# Altium PCB FullSheetOLD.PcbDoc (part 4 of 8)
Units mm, origin at the board's own origin, x right, y up, seen from the top; angles counter-clockwise.
Board outline 132.46 x 194.44 mm, 4 copper layers (Top Copper, L2_GND, L3_PWR_SIG, Bottom Copper), stack 1.586 mm thick; 495 components, 210 nets, 2171 pads, 1027 vias.
Unrouted connection lines stored in the file: 53.
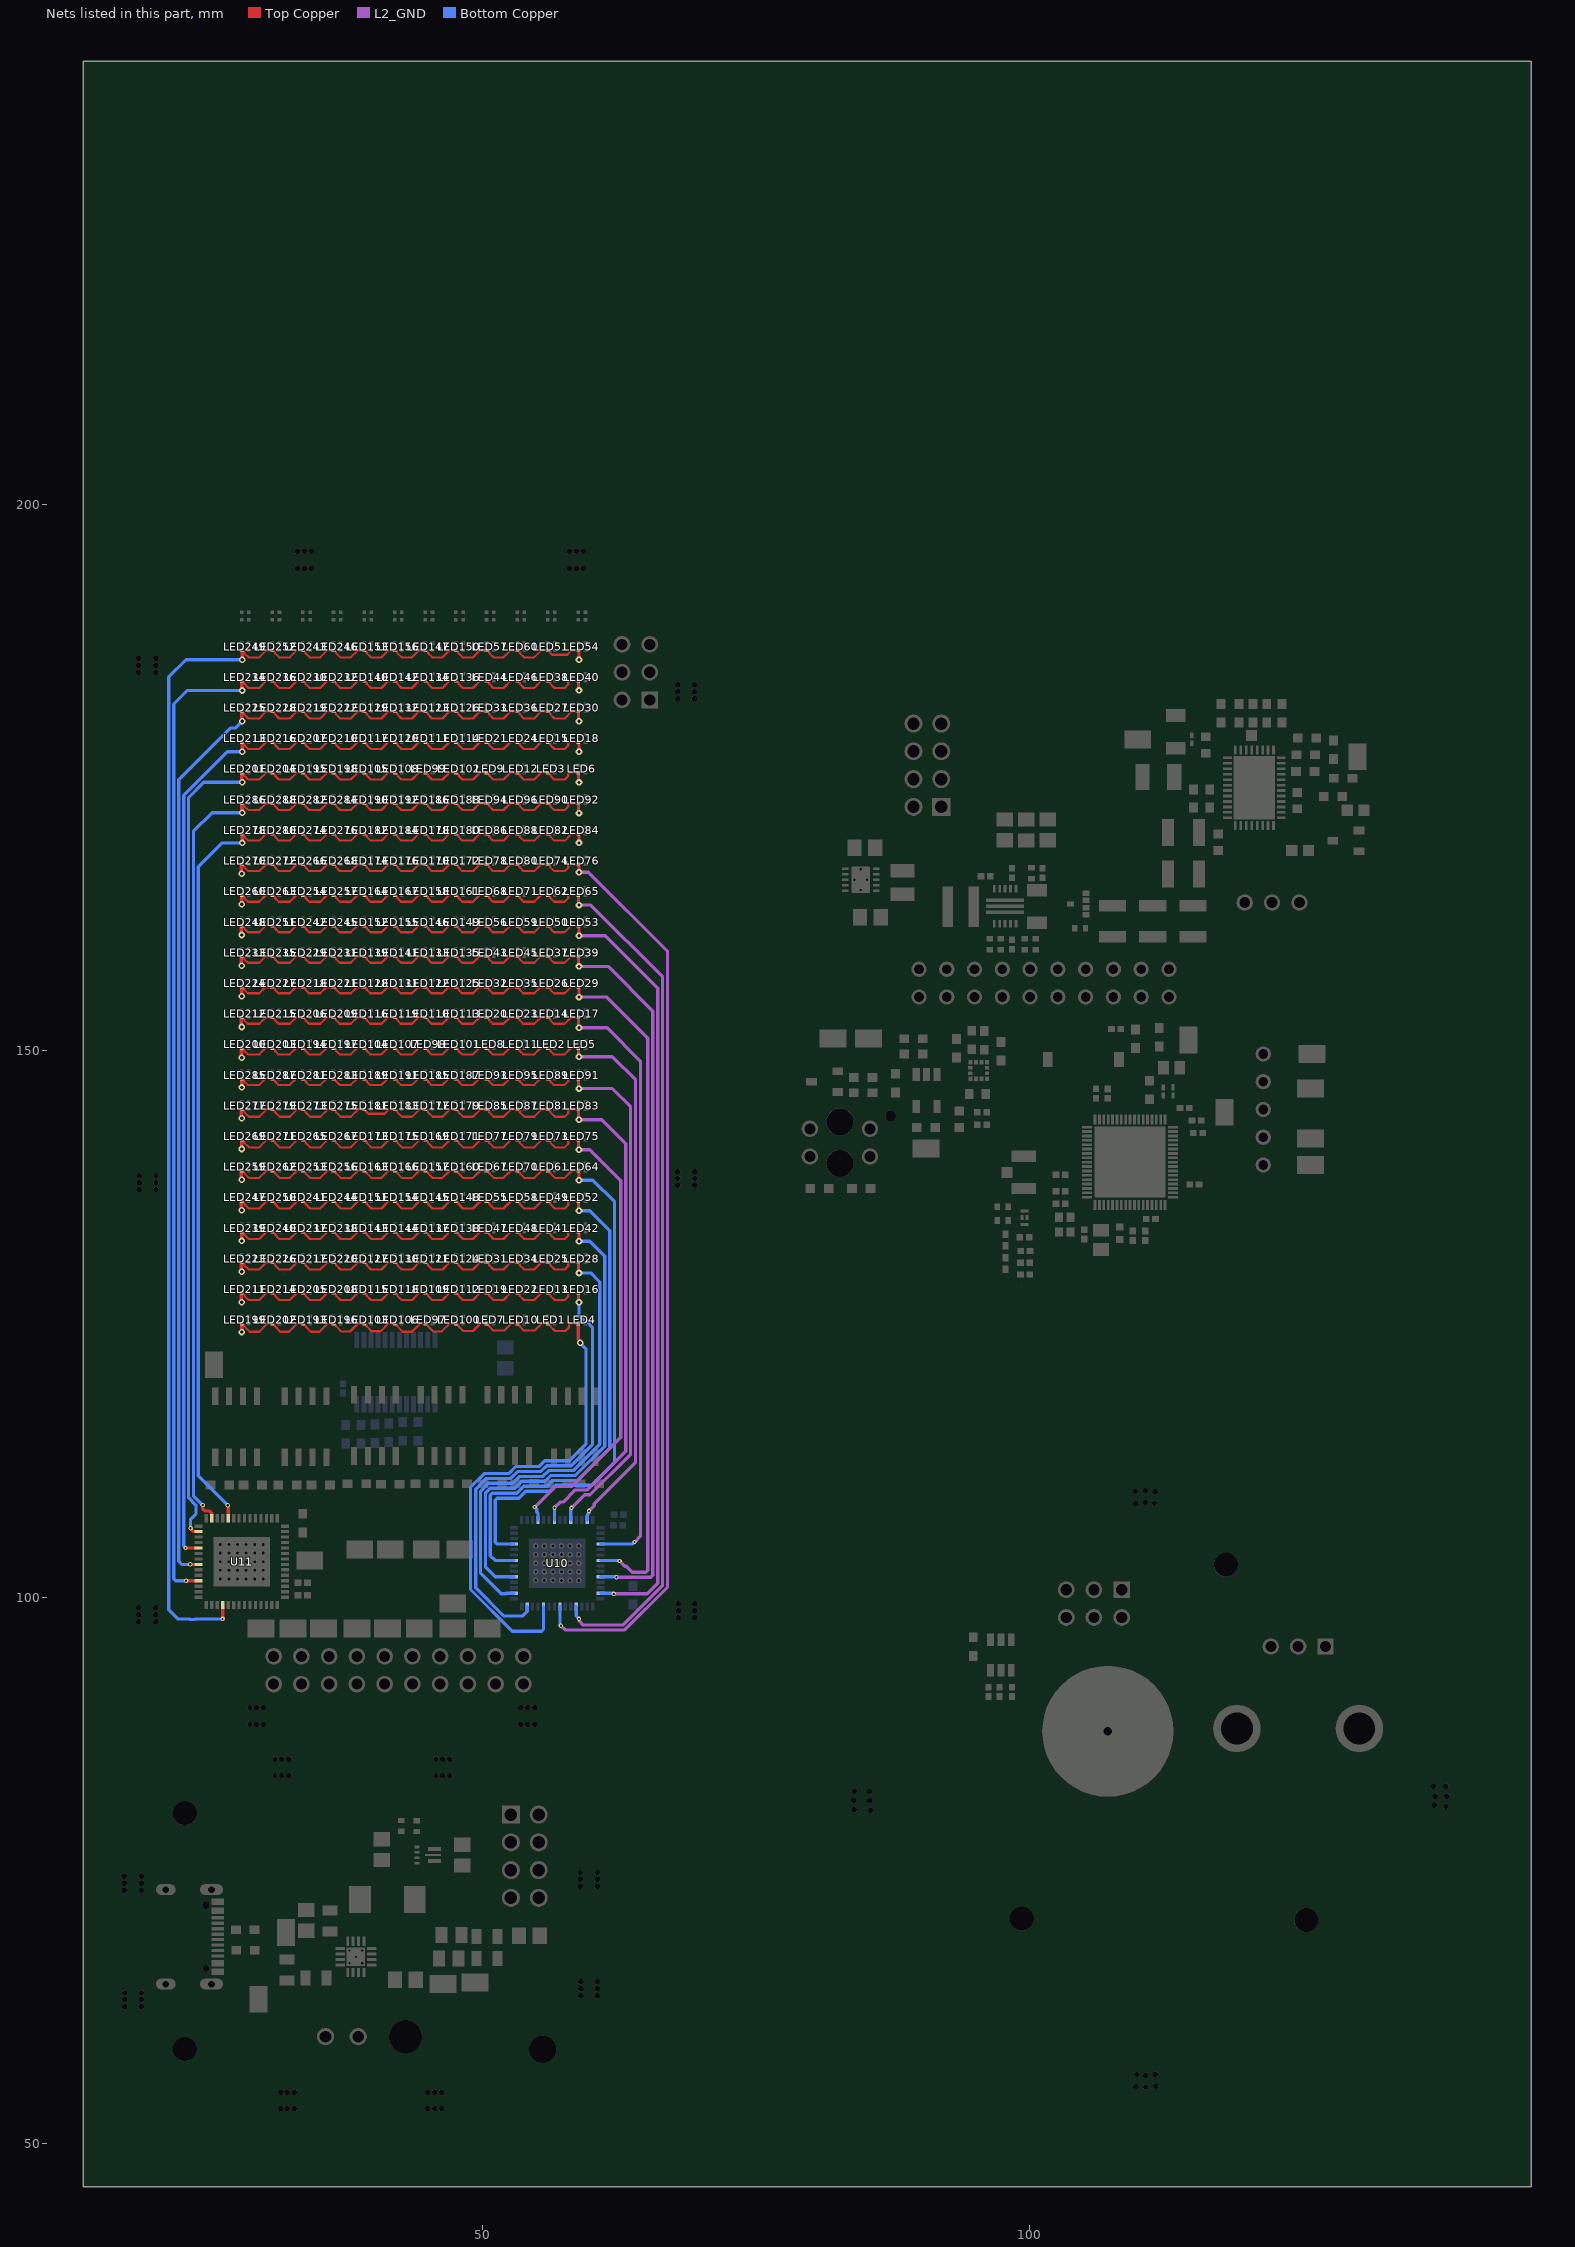
[diagram p5: the nets of this part, all layers, seen from the top]

## Via types
v1: diameter 0.6, hole 0.3, Top Copper to Bottom Copper, 857 vias
v2: diameter 0.8, hole 0.4, Top Copper to Bottom Copper, 91 vias
v3: diameter 0.4, hole 0.2, Top Copper to Bottom Copper, 79 vias

## Nets (pads, with @x,y where several pads share a name; then routed paths per layer and width w, separated by ;. In a path a pad name is that pad's centre, name@x,y a point inside that pad or via, vN(x,y) a via of type N, cw(c..) or ccw(c..) an arc to the next point about the centre after c; other vN are vias at no path point) (continued)
B0: LED1.1 LED4.1 LED7.1 LED10.1 LED97.1 LED100.1 LED103.1 LED106.1 LED193.1 LED196.1 LED199.1 LED202.1 U10.10 | length 82.1
  Top Copper w0.2: LED199.1@27.94,125.07 28.005,125.005 28.068,125.005 28.185,124.888 28.185,124.801 28.672,124.314 29.547,124.314 29.947,124.714 29.947,124.742 30.275,125.07 LED202.1@30.74,125.07 30.805,125.005 30.868,125.005 30.985,124.888 30.985,124.801 31.472,124.314 32.272,124.314 33.028,125.07 LED193.1@33.54,125.07 33.605,125.005 33.668,125.005 33.785,124.888 33.785,124.801 34.272,124.314 35.066,124.314 35.822,125.07 LED196.1@36.34,125.07 36.405,125.005 36.468,125.005 36.585,124.888 36.585,124.801 37.046,124.34 37.852,124.34 38.582,125.07 LED103.1@39.14,125.07 39.205,125.005 39.268,125.005 39.385,124.888 39.385,124.801 39.826,124.36 40.654,124.36 41.363,125.07 LED106.1@41.94,125.07 42.005,125.005 42.068,125.005 42.185,124.888 42.185,124.801 42.672,124.314 43.517,124.314 44.273,125.07 LED97.1@44.74,125.07 44.805,125.005 44.868,125.005 44.985,124.888 44.985,124.801 45.438,124.349 46.249,124.349 46.971,125.07 LED100.1@47.54,125.07 47.605,125.005 47.668,125.005 47.785,124.888 47.785,124.801 48.2,124.386 49.108,124.386 49.792,125.07 LED7.1@50.34,125.07 50.405,125.005 50.468,125.005 50.585,124.888 50.585,124.801 50.953,124.434 51.969,124.434 52.605,125.07 LED10.1@53.14,125.07 53.205,125.005 53.268,125.005 53.385,124.888 53.385,124.801 53.753,124.434 54.765,124.434 55.401,125.07 LED1.1@55.94,125.07 56.005,125.005 56.068,125.005 56.185,124.888 56.185,124.801 56.6,124.386 57.559,124.386 57.881,124.708 57.881,124.953 57.998,125.07 LED4.1@58.74,125.07
  Top Copper w0.3: v1(27.941,124.28) LED199.1@27.941,125.052 ; LED4.1@58.74,125.07 58.74,124.228 58.729,124.217 58.729,123.597 58.928,123.398 v1(58.928,123.317)
  Bottom Copper w0.3: U10.10@55.557,99.176 55.557,98.861 55.557,97.077 55.381,96.901 52.704,96.901 48.877,100.728 48.877,110.085 50.131,111.339 52.359,111.339 52.994,111.974 55.135,111.974 55.669,112.508 57.921,112.508 59.436,114.023 59.436,122.764 58.928,123.272 v1(58.928,123.317)
B1: LED13.1 LED16.1 LED19.1 LED22.1 LED109.1 LED112.1 LED115.1 LED118.1 LED205.1 LED208.1 LED211.1 LED214.1 U10.13 | length 80.6
  Top Copper w0.2: LED211.1@27.94,127.87 28.005,127.805 28.068,127.805 28.185,127.688 28.185,127.601 28.574,127.212 29.55,127.212 30.208,127.87 LED214.1@30.74,127.87 30.805,127.805 30.868,127.805 30.985,127.688 30.985,127.601 31.374,127.212 32.344,127.212 33.002,127.87 LED205.1@33.54,127.87 33.605,127.805 33.668,127.805 33.785,127.688 33.785,127.601 34.174,127.212 35.138,127.212 35.796,127.87 LED208.1@36.34,127.87 36.405,127.805 36.468,127.805 36.585,127.688 36.585,127.601 36.974,127.212 37.932,127.212 38.59,127.87 LED115.1@39.14,127.87 39.205,127.805 39.268,127.805 39.385,127.688 39.385,127.601 39.774,127.212 40.726,127.212 41.384,127.87 LED118.1@41.94,127.87 42.005,127.805 42.068,127.805 42.185,127.688 42.185,127.601 42.574,127.212 43.535,127.212 44.193,127.87 LED109.1@44.74,127.87 44.805,127.805 44.868,127.805 44.985,127.688 44.985,127.601 45.374,127.212 46.314,127.212 46.972,127.87 LED112.1@47.54,127.87 47.605,127.805 47.668,127.805 47.785,127.688 47.785,127.601 48.174,127.212 49.108,127.212 49.766,127.87 LED19.1@50.34,127.87 50.405,127.805 50.468,127.805 50.585,127.688 50.585,127.601 50.974,127.212 51.902,127.212 52.56,127.87 LED22.1@53.14,127.87 53.205,127.805 53.268,127.805 53.385,127.688 53.385,127.601 53.774,127.212 54.711,127.212 55.369,127.87 LED13.1@55.94,127.87 56.005,127.805 56.068,127.805 56.185,127.688 56.185,127.601 56.574,127.212 57.49,127.212 57.812,127.534 57.812,127.753 57.929,127.87 LED16.1@58.74,127.87
  Top Copper w0.3: v1@27.895,127.054 LED211.1@27.895,127.898 ; LED16.1@58.74,127.87 58.755,127.855 58.755,127.046 v1(58.801,127)
  Bottom Copper w0.3: U10.13@54.057,99.176 54.057,98.725 53.631,98.298 51.943,98.298 49.345,100.896 49.345,109.917 50.317,110.889 52.545,110.889 53.18,111.524 55.321,111.524 55.855,112.058 58.108,112.058 60.036,113.986 60.036,124.709 59.492,125.253 59.345,125.253 58.801,125.797 v1(58.801,127)
  other v1: 27.941,127.008
B2: LED25.1 LED28.1 LED31.1 LED34.1 LED121.1 LED124.1 LED127.1 LED130.1 LED217.1 LED220.1 LED223.1 LED226.1 U10.16 | length 80.5
  Top Copper w0.2: LED223.1@27.94,130.67 28.005,130.605 28.068,130.605 28.185,130.488 28.185,130.401 28.58,130.006 29.55,130.006 30.214,130.67 LED226.1@30.74,130.67 30.805,130.605 30.868,130.605 30.985,130.488 30.985,130.401 31.38,130.006 32.344,130.006 33.008,130.67 LED217.1@33.54,130.67 33.605,130.605 33.668,130.605 33.785,130.488 33.785,130.401 34.18,130.006 35.138,130.006 35.802,130.67 LED220.1@36.34,130.67 36.405,130.605 36.468,130.605 36.585,130.488 36.585,130.401 36.98,130.006 37.932,130.006 38.596,130.67 LED127.1@39.14,130.67 39.205,130.605 39.268,130.605 39.385,130.488 39.385,130.401 39.78,130.006 40.726,130.006 41.39,130.67 LED130.1@41.94,130.67 42.005,130.605 42.068,130.605 42.185,130.488 42.185,130.401 42.58,130.006 43.535,130.006 44.199,130.67 LED121.1@44.74,130.67 44.805,130.605 44.868,130.605 44.985,130.488 44.985,130.401 45.38,130.006 46.314,130.006 46.978,130.67 LED124.1@47.54,130.67 47.605,130.605 47.668,130.605 47.785,130.488 47.785,130.401 48.18,130.006 49.108,130.006 49.772,130.67 LED31.1@50.34,130.67 50.405,130.605 50.468,130.605 50.585,130.488 50.585,130.401 50.98,130.006 51.902,130.006 52.566,130.67 LED34.1@53.14,130.67 53.205,130.605 53.268,130.605 53.385,130.488 53.385,130.401 53.78,130.006 54.711,130.006 55.375,130.67 LED25.1@55.94,130.67 56.005,130.605 56.068,130.605 56.185,130.488 56.185,130.401 56.58,130.006 57.49,130.006 57.812,130.328 57.812,130.553 57.929,130.67 LED28.1@58.74,130.67
  Top Copper w0.3: v1@27.895,129.859 LED223.1@27.895,130.698 ; LED28.1@58.74,130.67 58.755,130.655 58.755,129.735 v1(58.801,129.689)
  Bottom Copper w0.3: U10.16@52.846,100.386 52.153,100.386 52.104,100.336 51.683,100.336 49.795,102.224 49.795,109.73 50.504,110.439 52.732,110.439 53.367,111.074 55.508,111.074 56.042,111.608 58.294,111.608 60.706,114.02 60.706,128.865 59.881,129.689 v1(58.801,129.689)
  other v1: 27.941,129.813
B3: LED41.1 LED42.1 LED47.1 LED48.1 LED137.1 LED138.1 LED143.1 LED144.1 LED237.1 LED238.1 LED239.1 LED240.1 U10.19 | length 82
  Top Copper w0.2: LED239.1@27.94,133.47 28.005,133.405 28.068,133.405 28.185,133.288 28.185,133.201 28.586,132.8 29.55,132.8 30.22,133.47 LED240.1@30.74,133.47 30.805,133.405 30.868,133.405 30.985,133.288 30.985,133.201 31.386,132.8 32.344,132.8 33.014,133.47 LED237.1@33.54,133.47 33.605,133.405 33.668,133.405 33.785,133.288 33.785,133.201 34.186,132.8 35.138,132.8 35.808,133.47 LED238.1@36.34,133.47 36.405,133.405 36.468,133.405 36.585,133.288 36.585,133.201 36.986,132.8 37.932,132.8 38.602,133.47 LED143.1@39.14,133.47 39.205,133.405 39.268,133.405 39.385,133.288 39.385,133.201 39.786,132.8 40.726,132.8 41.396,133.47 LED144.1@41.94,133.47 42.005,133.405 42.068,133.405 42.185,133.288 42.185,133.201 42.586,132.8 43.535,132.8 44.205,133.47 LED137.1@44.74,133.47 44.805,133.405 44.868,133.405 44.985,133.288 44.985,133.201 45.386,132.8 46.314,132.8 46.984,133.47 LED138.1@47.54,133.47 47.605,133.405 47.668,133.405 47.785,133.288 47.785,133.201 48.186,132.8 49.108,132.8 49.778,133.47 LED47.1@50.34,133.47 50.405,133.405 50.468,133.405 50.585,133.288 50.585,133.201 50.986,132.8 51.902,132.8 52.572,133.47 LED48.1@53.14,133.47 53.205,133.405 53.268,133.405 53.385,133.288 53.385,133.201 53.786,132.8 54.711,132.8 55.381,133.47 LED41.1@55.94,133.47 56.005,133.405 56.068,133.405 56.185,133.288 56.185,133.201 56.586,132.8 57.49,132.8 57.812,133.122 57.812,133.353 57.929,133.47 LED42.1@58.74,133.47
  Top Copper w0.3: v1(27.941,132.618) LED239.1@27.941,133.368 ; LED42.1@58.74,133.47 58.755,133.455 58.755,133.384 58.801,133.338 v1(58.801,132.588)
  Bottom Copper w0.3: U10.19@52.846,101.886 51.149,101.886 50.245,102.79 50.245,109.544 50.69,109.989 52.918,109.989 53.553,110.624 55.694,110.624 56.228,111.158 58.48,111.158 61.156,113.834 61.156,131.209 59.777,132.588 v1(58.801,132.588)
B4: LED49.1 LED52.1 LED55.1 LED58.1 LED145.1 LED148.1 LED151.1 LED154.1 LED241.1 LED244.1 LED247.1 LED250.1 U10.22 | length 83.4
  Top Copper w0.2: LED247.1@27.94,136.27 28.005,136.205 28.068,136.205 28.185,136.088 28.185,136.001 28.592,135.594 29.55,135.594 30.226,136.27 LED250.1@30.74,136.27 30.805,136.205 30.868,136.205 30.985,136.088 30.985,136.001 31.392,135.594 32.344,135.594 33.02,136.27 LED241.1@33.54,136.27 33.605,136.205 33.668,136.205 33.785,136.088 33.785,136.001 34.192,135.594 35.138,135.594 35.814,136.27 LED244.1@36.34,136.27 36.405,136.205 36.468,136.205 36.585,136.088 36.585,136.001 36.992,135.594 37.932,135.594 38.608,136.27 LED151.1@39.14,136.27 39.205,136.205 39.268,136.205 39.385,136.088 39.385,136.001 39.792,135.594 40.726,135.594 41.402,136.27 LED154.1@41.94,136.27 42.005,136.205 42.068,136.205 42.185,136.088 42.185,136.001 42.592,135.594 43.535,135.594 44.211,136.27 LED145.1@44.74,136.27 44.805,136.205 44.868,136.205 44.985,136.088 44.985,136.001 45.392,135.594 46.314,135.594 46.99,136.27 LED148.1@47.54,136.27 47.605,136.205 47.668,136.205 47.785,136.088 47.785,136.001 48.192,135.594 49.108,135.594 49.784,136.27 LED55.1@50.34,136.27 50.405,136.205 50.468,136.205 50.585,136.088 50.585,136.001 50.992,135.594 51.902,135.594 52.578,136.27 LED58.1@53.14,136.27 53.205,136.205 53.268,136.205 53.385,136.088 53.385,136.001 53.792,135.594 54.711,135.594 55.387,136.27 LED49.1@55.94,136.27 56.005,136.205 56.068,136.205 56.185,136.088 56.185,136.001 56.592,135.594 57.49,135.594 57.812,135.916 57.812,136.153 57.929,136.27 LED52.1@58.74,136.27
  Top Copper w0.3: v1@27.895,135.469 LED247.1@27.895,136.298 ; LED52.1@58.74,136.27 58.755,136.255 58.755,135.428 v1(58.801,135.382)
  Bottom Copper w0.3: U10.22@52.846,103.387 51.134,103.387 50.695,103.826 50.695,109.358 50.877,109.539 53.105,109.539 53.739,110.174 55.881,110.174 56.415,110.708 58.667,110.708 61.606,113.647 61.606,133.553 59.777,135.382 v1(58.801,135.382)
  other v1: 27.941,135.423
B5: LED61.1 LED64.1 LED67.1 LED70.1 LED157.1 LED160.1 LED163.1 LED166.1 LED253.1 LED256.1 LED259.1 LED262.1 U10.25 | length 85.2
  Top Copper w0.2: LED259.1@27.94,139.07 28.005,139.005 28.068,139.005 28.185,138.888 28.185,138.801 28.598,138.388 29.55,138.388 30.232,139.07 LED262.1@30.74,139.07 30.805,139.005 30.868,139.005 30.985,138.888 30.985,138.801 31.398,138.388 32.344,138.388 33.026,139.07 LED253.1@33.54,139.07 33.605,139.005 33.668,139.005 33.785,138.888 33.785,138.801 34.198,138.388 35.138,138.388 35.82,139.07 LED256.1@36.34,139.07 36.405,139.005 36.468,139.005 36.585,138.888 36.585,138.801 36.998,138.388 37.932,138.388 38.614,139.07 LED163.1@39.14,139.07 39.205,139.005 39.268,139.005 39.385,138.888 39.385,138.801 39.798,138.388 40.726,138.388 41.408,139.07 LED166.1@41.94,139.07 42.005,139.005 42.068,139.005 42.185,138.888 42.185,138.801 42.598,138.388 43.535,138.388 44.217,139.07 LED157.1@44.74,139.07 44.805,139.005 44.868,139.005 44.985,138.888 44.985,138.801 45.398,138.388 46.314,138.388 46.996,139.07 LED160.1@47.54,139.07 47.605,139.005 47.668,139.005 47.785,138.888 47.785,138.801 48.198,138.388 49.108,138.388 49.79,139.07 LED67.1@50.34,139.07 50.405,139.005 50.468,139.005 50.585,138.888 50.585,138.801 50.998,138.388 51.902,138.388 52.584,139.07 LED70.1@53.14,139.07 53.205,139.005 53.268,139.005 53.385,138.888 53.385,138.801 53.798,138.388 54.711,138.388 55.393,139.07 LED61.1@55.94,139.07 56.005,139.005 56.068,139.005 56.185,138.888 56.185,138.801 56.598,138.388 57.49,138.388 58.172,139.07 LED64.1@58.74,139.07
  Top Copper w0.3: v1@27.895,138.274 LED259.1@27.895,139.098 ; LED64.1@58.74,139.07 58.755,139.055 58.801,139.009 v1(58.801,138.176)
  Bottom Copper w0.3: U10.25@52.846,104.887 51.323,104.887 51.145,105.065 51.145,108.913 51.321,109.089 53.291,109.089 53.926,109.724 56.126,109.724 56.66,110.258 59.96,110.258 62.056,112.354 62.056,136.191 60.071,138.176 v1(58.801,138.176)
  other v1: 27.941,138.228
B6: LED73.1 LED75.1 LED77.1 LED79.1 LED169.1 LED171.1 LED173.1 LED175.1 LED265.1 LED267.1 LED269.1 LED271.1 U10.32 | length 79.7
  Top Copper w0.2: LED269.1@27.94,141.87 28.005,141.805 28.068,141.805 28.185,141.688 28.185,141.601 28.604,141.182 29.55,141.182 30.238,141.87 LED271.1@30.74,141.87 30.805,141.805 30.868,141.805 30.985,141.688 30.985,141.601 31.404,141.182 32.344,141.182 33.032,141.87 LED265.1@33.54,141.87 33.605,141.805 33.668,141.805 33.785,141.688 33.785,141.601 34.204,141.182 35.138,141.182 35.826,141.87 LED267.1@36.34,141.87 36.405,141.805 36.468,141.805 36.585,141.688 36.585,141.601 37.004,141.182 37.932,141.182 38.62,141.87 LED173.1@39.14,141.87 39.205,141.805 39.268,141.805 39.385,141.688 39.385,141.601 39.804,141.182 40.726,141.182 41.414,141.87 LED175.1@41.94,141.87 42.005,141.805 42.068,141.805 42.185,141.688 42.185,141.601 42.604,141.182 43.535,141.182 44.223,141.87 LED169.1@44.74,141.87 44.805,141.805 44.868,141.805 44.985,141.688 44.985,141.601 45.404,141.182 46.314,141.182 47.002,141.87 LED171.1@47.54,141.87 47.605,141.805 47.668,141.805 47.785,141.688 47.785,141.601 48.204,141.182 49.108,141.182 49.796,141.87 LED77.1@50.34,141.87 50.405,141.805 50.468,141.805 50.585,141.688 50.585,141.601 51.004,141.182 51.902,141.182 52.59,141.87 LED79.1@53.14,141.87 53.205,141.805 53.268,141.805 53.385,141.688 53.385,141.601 53.804,141.182 54.711,141.182 55.399,141.87 LED73.1@55.94,141.87 56.005,141.805 56.068,141.805 56.185,141.688 56.185,141.601 56.604,141.182 57.49,141.182 57.812,141.504 57.812,141.753 57.929,141.87 LED75.1@58.74,141.87
  Top Copper w0.3: v1(27.941,141.033) LED269.1@27.941,141.783 ; LED75.1@58.74,141.87 58.755,141.855 58.755,141.016 v1(58.801,140.97)
  L2_GND w0.3: v3(54.745,108.275) 56.618,110.148 58.106,110.148 62.625,114.666 62.625,138.122 59.777,140.97 v1(58.801,140.97)
  Bottom Copper w0.3: v3(54.745,108.275) 54.745,108.248 54.93,108.063 54.93,107.811 55.057,107.683 U10.32@55.057,107.097
B7: LED81.1 LED83.1 LED85.1 LED87.1 LED177.1 LED179.1 LED181.1 LED183.1 LED273.1 LED275.1 LED277.1 LED279.1 U10.35 | length 82.5
  Top Copper w0.2: LED277.1@27.94,144.67 28.005,144.605 28.068,144.605 28.185,144.488 28.185,144.401 28.61,143.976 29.55,143.976 30.244,144.67 LED279.1@30.74,144.67 30.805,144.605 30.868,144.605 30.985,144.488 30.985,144.401 31.41,143.976 32.344,143.976 33.038,144.67 LED273.1@33.54,144.67 33.605,144.605 33.668,144.605 33.785,144.488 33.785,144.401 34.21,143.976 35.138,143.976 35.832,144.67 LED275.1@36.34,144.67 36.405,144.605 36.468,144.605 36.585,144.488 36.585,144.401 37.01,143.976 37.932,143.976 38.626,144.67 LED181.1@39.14,144.67 39.385,144.425 39.385,144.401 39.531,144.255 41.005,144.255 41.42,144.67 LED183.1@41.94,144.67 42.005,144.605 42.068,144.605 42.185,144.488 42.185,144.401 42.61,143.976 43.535,143.976 44.229,144.67 LED177.1@44.74,144.67 44.805,144.605 44.868,144.605 44.985,144.488 44.985,144.401 45.41,143.976 46.314,143.976 47.008,144.67 LED179.1@47.54,144.67 47.605,144.605 47.668,144.605 47.785,144.488 47.785,144.401 48.21,143.976 49.108,143.976 49.802,144.67 LED85.1@50.34,144.67 50.405,144.605 50.468,144.605 50.585,144.488 50.585,144.401 51.01,143.976 51.902,143.976 52.596,144.67 LED87.1@53.14,144.67 53.205,144.605 53.268,144.605 53.385,144.488 53.385,144.401 53.81,143.976 54.711,143.976 55.405,144.67 LED81.1@55.94,144.67 56.005,144.605 56.068,144.605 56.185,144.488 56.185,144.401 56.61,143.976 57.49,143.976 57.812,144.298 57.812,144.553 57.929,144.67 LED83.1@58.74,144.67
  Top Copper w0.3: v1@27.895,143.884 LED277.1@27.895,144.698 ; LED83.1@58.74,144.67 58.755,144.655 58.755,143.76 v1(58.801,143.714)
  L2_GND w0.3: v3(56.557,108.204) 57.08,108.727 57.346,108.727 58.46,109.84 59.542,109.84 63.075,113.373 63.075,141.522 60.883,143.714 v1(58.801,143.714)
  Bottom Copper w0.3: U10.35@56.557,107.097 v3(56.557,108.204)
  other v1: 27.941,143.838
B8: LED89.1 LED91.1 LED93.1 LED95.1 LED185.1 LED187.1 LED189.1 LED191.1 LED281.1 LED283.1 LED285.1 LED287.1 U10.38 | length 84.1
  Top Copper w0.2: LED285.1@27.94,147.47 28.005,147.405 28.068,147.405 28.185,147.288 28.185,147.201 28.489,146.897 29.55,146.897 30.123,147.47 LED287.1@30.74,147.47 30.805,147.405 30.868,147.405 30.985,147.288 30.985,147.201 31.289,146.897 32.344,146.897 32.917,147.47 LED281.1@33.54,147.47 33.605,147.405 33.668,147.405 33.785,147.288 33.785,147.201 34.089,146.897 35.138,146.897 35.711,147.47 LED283.1@36.34,147.47 36.405,147.405 36.468,147.405 36.585,147.288 36.585,147.201 36.889,146.897 37.932,146.897 38.505,147.47 LED189.1@39.14,147.47 39.205,147.405 39.268,147.405 39.385,147.288 39.385,147.201 39.689,146.897 40.726,146.897 41.299,147.47 LED191.1@41.94,147.47 42.005,147.405 42.068,147.405 42.185,147.288 42.185,147.201 42.489,146.897 43.535,146.897 44.108,147.47 LED185.1@44.74,147.47 44.805,147.405 44.868,147.405 44.985,147.288 44.985,147.201 45.289,146.897 46.314,146.897 46.887,147.47 LED187.1@47.54,147.47 47.605,147.405 47.668,147.405 47.785,147.288 47.785,147.201 48.089,146.897 49.108,146.897 49.681,147.47 LED93.1@50.34,147.47 50.405,147.405 50.468,147.405 50.585,147.288 50.585,147.201 50.889,146.897 51.902,146.897 52.475,147.47 LED95.1@53.14,147.47 53.205,147.405 53.268,147.405 53.385,147.288 53.385,147.201 53.689,146.897 54.711,146.897 55.284,147.47 LED89.1@55.94,147.47 56.005,147.405 56.068,147.405 56.185,147.288 56.185,147.201 56.489,146.897 57.49,146.897 57.812,147.219 57.812,147.353 57.929,147.47 LED91.1@58.74,147.47
  Top Copper w0.3: v1(27.939,146.662) LED285.1@27.939,147.434 ; LED91.1@58.74,147.47 58.755,147.455 58.755,146.604 v1(58.801,146.558)
  L2_GND w0.3: v3(58.123,108.196) 59.316,109.39 59.809,109.39 63.525,113.106 63.525,144.882 61.975,146.432 61.849,146.558 v1(58.801,146.558)
  Bottom Copper w0.3: U10.38@58.057,107.097 58.057,108.103 58.123,108.169 v3(58.123,108.196)
B9: LED2.1 LED5.1 LED8.1 LED11.1 LED98.1 LED101.1 LED104.1 LED107.1 LED194.1 LED197.1 LED200.1 LED203.1 U10.41 | length 86.4
  Top Copper w0.2: LED200.1@27.94,150.27 28.005,150.205 28.068,150.205 28.185,150.088 28.185,150.001 28.495,149.691 29.55,149.691 30.129,150.27 LED203.1@30.74,150.27 30.805,150.205 30.868,150.205 30.985,150.088 30.985,150.001 31.295,149.691 32.344,149.691 32.923,150.27 LED194.1@33.54,150.27 33.605,150.205 33.668,150.205 33.785,150.088 33.785,150.001 34.095,149.691 35.138,149.691 35.717,150.27 LED197.1@36.34,150.27 36.405,150.205 36.468,150.205 36.585,150.088 36.585,150.001 36.895,149.691 37.932,149.691 38.511,150.27 LED104.1@39.14,150.27 39.205,150.205 39.268,150.205 39.385,150.088 39.385,150.001 39.695,149.691 40.726,149.691 41.305,150.27 LED107.1@41.94,150.27 42.005,150.205 42.068,150.205 42.185,150.088 42.185,150.001 42.495,149.691 43.535,149.691 44.114,150.27 LED98.1@44.74,150.27 44.805,150.205 44.868,150.205 44.985,150.088 44.985,150.001 45.295,149.691 46.314,149.691 46.893,150.27 LED101.1@47.54,150.27 47.605,150.205 47.668,150.205 47.785,150.088 47.785,150.001 48.095,149.691 49.108,149.691 49.687,150.27 LED8.1@50.34,150.27 50.405,150.205 50.468,150.205 50.585,150.088 50.585,150.001 50.895,149.691 51.902,149.691 52.481,150.27 LED11.1@53.14,150.27 53.205,150.205 53.268,150.205 53.385,150.088 53.385,150.001 53.695,149.691 54.711,149.691 55.29,150.27 LED2.1@55.94,150.27 56.005,150.205 56.068,150.205 56.185,150.088 56.185,150.001 56.495,149.691 57.49,149.691 58.069,150.27 LED5.1@58.74,150.27
  Top Copper w0.3: v1@27.893,149.436 LED200.1@27.893,150.28 ; LED5.1@58.74,150.27 58.755,150.255 58.755,149.525 v1(58.801,149.479)
  L2_GND w0.3: v1(58.801,149.479) 61.849,149.479 63.975,147.353 63.975,112.362 60.195,108.582 60.195,108.4 v3(59.72,107.925)
  Bottom Copper w0.3: U10.41@59.557,107.097 59.557,107.549 59.701,107.693 59.701,107.906 v3(59.72,107.925)
  other v1: 27.939,149.39
B10: LED14.1 LED17.1 LED20.1 LED23.1 LED110.1 LED113.1 LED116.1 LED119.1 LED206.1 LED209.1 LED212.1 LED215.1 U10.46 | length 92.8
  Top Copper w0.2: LED212.1@27.94,153.07 28.005,153.005 28.068,153.005 28.185,152.888 28.185,152.801 28.501,152.485 29.55,152.485 30.135,153.07 LED215.1@30.74,153.07 30.805,153.005 30.868,153.005 30.985,152.888 30.985,152.801 31.301,152.485 32.344,152.485 32.929,153.07 LED206.1@33.54,153.07 33.605,153.005 33.668,153.005 33.785,152.888 33.785,152.801 34.101,152.485 35.138,152.485 35.723,153.07 LED209.1@36.34,153.07 36.405,153.005 36.468,153.005 36.585,152.888 36.585,152.801 36.901,152.485 37.932,152.485 38.517,153.07 LED116.1@39.14,153.07 39.205,153.005 39.268,153.005 39.385,152.888 39.385,152.801 39.701,152.485 40.726,152.485 41.311,153.07 LED119.1@41.94,153.07 42.005,153.005 42.068,153.005 42.185,152.888 42.185,152.801 42.501,152.485 43.52,152.485 44.105,153.07 LED110.1@44.74,153.07 44.805,153.005 44.868,153.005 44.985,152.888 44.985,152.801 45.301,152.485 46.314,152.485 46.899,153.07 LED113.1@47.54,153.07 47.605,153.005 47.668,153.005 47.785,152.888 47.785,152.801 48.101,152.485 49.108,152.485 49.693,153.07 LED20.1@50.34,153.07 50.405,153.005 50.468,153.005 50.585,152.888 50.585,152.801 50.901,152.485 51.902,152.485 52.487,153.07 LED23.1@53.14,153.07 53.205,153.005 53.268,153.005 53.385,152.888 53.385,152.801 53.701,152.485 54.711,152.485 55.296,153.07 LED14.1@55.94,153.07 56.005,153.005 56.068,153.005 56.185,152.888 56.185,152.801 56.501,152.485 57.49,152.485 58.075,153.07 LED17.1@58.74,153.07
  Top Copper w0.3: v1@27.893,152.241 LED212.1@27.893,153.08 ; LED17.1@58.74,153.07 58.755,153.055 58.755,152.164 v1(58.801,152.118)
  L2_GND w0.3: v1(58.801,152.118) 61.369,152.118 64.425,149.062 64.425,105.584 63.943,105.102 63.941,105.102 63.911,105.072 v3(63.884,105.072)
  Bottom Copper w0.3: U10.46@60.768,104.887 63.672,104.887 63.857,105.072 v3(63.884,105.072)
  other v1: 27.939,152.195
B11: LED26.1 LED29.1 LED32.1 LED35.1 LED122.1 LED125.1 LED128.1 LED131.1 LED218.1 LED221.1 LED224.1 LED227.1 U10.49 | length 99.3
  Top Copper w0.2: LED224.1@27.94,155.87 28.005,155.805 28.068,155.805 28.185,155.688 28.185,155.601 28.507,155.279 29.55,155.279 30.076,155.805 30.868,155.805 30.985,155.688 30.985,155.601 31.307,155.279 32.344,155.279 32.87,155.805 33.668,155.805 33.785,155.688 33.785,155.601 34.107,155.279 35.138,155.279 35.664,155.805 36.468,155.805 36.585,155.688 36.585,155.601 36.907,155.279 37.932,155.279 38.458,155.805 39.268,155.805 39.385,155.688 39.385,155.601 39.707,155.279 40.726,155.279 41.252,155.805 42.068,155.805 42.185,155.688 42.185,155.601 42.507,155.279 43.52,155.279 44.046,155.805 44.868,155.805 44.985,155.688 44.985,155.601 45.307,155.279 46.314,155.279 46.84,155.805 47.668,155.805 47.785,155.688 47.785,155.601 48.107,155.279 49.108,155.279 49.634,155.805 50.468,155.805 50.585,155.688 50.585,155.601 50.907,155.279 51.902,155.279 52.428,155.805 53.268,155.805 53.385,155.688 53.385,155.601 53.707,155.279 54.711,155.279 55.237,155.805 56.068,155.805 56.185,155.688 56.185,155.601 56.507,155.279 57.49,155.279 58.081,155.87 LED29.1@58.74,155.87
  Top Copper w0.3: v1(27.939,155) LED224.1@27.939,155.75 ; LED29.1@58.74,155.87 58.755,155.855 58.755,155.73 58.801,155.685 v1(58.801,154.935)
  L2_GND w0.3: v1(58.801,154.935) 61.346,154.935 65.099,151.182 65.099,102.48 64.923,102.304 63.673,102.304 63.12,102.857 62.995,102.857 v3(62.516,103.336)
  Bottom Copper w0.3: U10.49@60.768,103.387 62.438,103.387 62.489,103.336 v3(62.516,103.336)
B12: LED37.1 LED39.1 LED43.1 LED45.1 LED133.1 LED135.1 LED139.1 LED141.1 LED229.1 LED231.1 LED233.1 LED235.1 U10.52 | length 103.5
  Top Copper w0.2: LED233.1@27.94,158.67 28.005,158.605 28.068,158.605 28.185,158.488 28.185,158.401 28.513,158.073 29.55,158.073 30.147,158.67 LED235.1@30.74,158.67 30.805,158.605 30.868,158.605 30.985,158.488 30.985,158.401 31.313,158.073 32.344,158.073 32.941,158.67 LED229.1@33.54,158.67 33.605,158.605 33.668,158.605 33.785,158.488 33.785,158.401 34.113,158.073 35.138,158.073 35.735,158.67 LED231.1@36.34,158.67 36.405,158.605 36.468,158.605 36.585,158.488 36.585,158.401 36.913,158.073 37.932,158.073 38.529,158.67 LED139.1@39.14,158.67 39.205,158.605 39.268,158.605 39.385,158.488 39.385,158.401 39.713,158.073 40.726,158.073 41.323,158.67 LED141.1@41.94,158.67 42.005,158.605 42.068,158.605 42.185,158.488 42.185,158.401 42.513,158.073 43.52,158.073 44.117,158.67 LED133.1@44.74,158.67 44.805,158.605 44.868,158.605 44.985,158.488 44.985,158.401 45.313,158.073 46.314,158.073 46.911,158.67 LED135.1@47.54,158.67 47.605,158.605 47.668,158.605 47.785,158.488 47.785,158.401 48.113,158.073 49.108,158.073 49.705,158.67 LED43.1@50.34,158.67 50.405,158.605 50.468,158.605 50.585,158.488 50.585,158.401 50.913,158.073 51.902,158.073 52.499,158.67 LED45.1@53.14,158.67 53.205,158.605 53.268,158.605 53.385,158.488 53.385,158.401 53.713,158.073 54.711,158.073 55.308,158.67 LED37.1@55.94,158.67 56.005,158.605 56.068,158.605 56.185,158.488 56.185,158.401 56.513,158.073 57.49,158.073 58.087,158.67 LED39.1@58.74,158.67
  Top Copper w0.3: v1@27.893,157.851 LED233.1@27.893,158.68 ; LED39.1@58.74,158.67 58.755,158.655 58.755,157.785 v1(58.801,157.74)
  L2_GND w0.3: v1(58.801,157.74) 61.462,157.74 65.549,153.653 65.549,102.03 65.373,101.854 v3@62.259,101.854
  Bottom Copper w0.3: U10.52@60.768,101.886 62.181,101.886 62.213,101.854 v3(62.24,101.854)
  other v1: 27.939,157.805
B13: LED50.1 LED53.1 LED56.1 LED59.1 LED146.1 LED149.1 LED152.1 LED155.1 LED242.1 LED245.1 LED248.1 LED251.1 U10.55 | length 107.9
  Top Copper w0.2: LED248.1@27.94,161.47 28.005,161.405 28.068,161.405 28.185,161.288 28.185,161.201 28.519,160.867 29.55,160.867 30.153,161.47 LED251.1@30.74,161.47 30.805,161.405 30.868,161.405 30.985,161.288 30.985,161.201 31.319,160.867 32.344,160.867 32.947,161.47 LED242.1@33.54,161.47 33.605,161.405 33.668,161.405 33.785,161.288 33.785,161.201 34.119,160.867 35.138,160.867 35.741,161.47 LED245.1@36.34,161.47 36.405,161.405 36.468,161.405 36.585,161.288 36.585,161.201 36.919,160.867 37.932,160.867 38.535,161.47 LED152.1@39.14,161.47 39.205,161.405 39.268,161.405 39.385,161.288 39.385,161.201 39.719,160.867 40.726,160.867 41.329,161.47 LED155.1@41.94,161.47 42.005,161.405 42.068,161.405 42.185,161.288 42.185,161.201 42.519,160.867 43.52,160.867 44.123,161.47 LED146.1@44.74,161.47 44.805,161.405 44.868,161.405 44.985,161.288 44.985,161.201 45.319,160.867 46.314,160.867 46.917,161.47 LED149.1@47.54,161.47 47.605,161.405 47.668,161.405 47.785,161.288 47.785,161.201 48.119,160.867 49.108,160.867 49.711,161.47 LED56.1@50.34,161.47 50.405,161.405 50.468,161.405 50.585,161.288 50.585,161.201 50.919,160.867 51.902,160.867 52.505,161.47 LED59.1@53.14,161.47 53.205,161.405 53.268,161.405 53.385,161.288 53.385,161.201 53.719,160.867 54.711,160.867 55.314,161.47 LED50.1@55.94,161.47 56.005,161.405 56.068,161.405 56.185,161.288 56.185,161.201 56.519,160.867 57.49,160.867 58.093,161.47 LED53.1@58.74,161.47
  Top Copper w0.3: v1@27.893,160.656 LED248.1@27.893,161.48 ; LED53.1@58.74,161.47 58.755,161.455 58.755,161.34 58.801,161.295 v1(58.801,160.545)
  L2_GND w0.3: v1(58.801,160.545) 61.197,160.545 65.999,155.743 65.999,101.305 65.032,100.338 61.984,100.338 v3(61.976,100.33)
  Bottom Copper w0.3: U10.55@60.768,100.386 61.893,100.386 61.949,100.33 v3(61.976,100.33)
  other v1: 27.939,160.61
B14: LED62.1 LED65.1 LED68.1 LED71.1 LED158.1 LED161.1 LED164.1 LED167.1 LED254.1 LED257.1 LED260.1 LED263.1 U10.4 | length 115.5
  Top Copper w0.2: LED260.1@27.94,164.27 28.005,164.205 28.068,164.205 28.185,164.088 28.185,164.001 28.525,163.661 29.55,163.661 30.159,164.27 LED263.1@30.74,164.27 30.805,164.205 30.868,164.205 30.985,164.088 30.985,164.001 31.325,163.661 32.344,163.661 32.953,164.27 LED254.1@33.54,164.27 33.605,164.205 33.668,164.205 33.785,164.088 33.785,164.001 34.125,163.661 35.138,163.661 35.747,164.27 LED257.1@36.34,164.27 36.405,164.205 36.468,164.205 36.585,164.088 36.585,164.001 36.925,163.661 37.932,163.661 38.541,164.27 LED164.1@39.14,164.27 39.205,164.205 39.268,164.205 39.385,164.088 39.385,164.001 39.725,163.661 40.726,163.661 41.335,164.27 LED167.1@41.94,164.27 42.005,164.205 42.068,164.205 42.185,164.088 42.185,164.001 42.525,163.661 43.52,163.661 44.129,164.27 LED158.1@44.74,164.27 44.805,164.205 44.868,164.205 44.985,164.088 44.985,164.001 45.325,163.661 46.314,163.661 46.923,164.27 LED161.1@47.54,164.27 47.605,164.205 47.668,164.205 47.785,164.088 47.785,164.001 48.125,163.661 49.108,163.661 49.717,164.27 LED68.1@50.34,164.27 50.405,164.205 50.468,164.205 50.585,164.088 50.585,164.001 50.925,163.661 51.902,163.661 52.511,164.27 LED71.1@53.14,164.27 53.205,164.205 53.268,164.205 53.385,164.088 53.385,164.001 53.725,163.661 54.711,163.661 55.32,164.27 LED62.1@55.94,164.27 56.005,164.205 56.068,164.205 56.185,164.088 56.185,164.001 56.525,163.661 57.49,163.661 57.812,163.983 57.812,164.153 57.929,164.27 LED65.1@58.74,164.27
  Top Copper w0.3: v1(27.939,163.415) LED260.1@27.939,164.165 ; LED65.1@58.74,164.27 58.755,164.255 58.755,163.396 v1(58.801,163.35)
  L2_GND w0.3: v3(58.799,98.036) 58.818,98.017 58.818,97.86 59.2,97.478 62.808,97.478 66.449,101.119 66.449,156.776 59.876,163.35 v1(58.801,163.35)
  Bottom Copper w0.3: U10.4@58.557,99.176 58.557,98.305 58.799,98.063 v3(58.799,98.036)
B15: LED74.1 LED76.1 LED78.1 LED80.1 LED170.1 LED172.1 LED174.1 LED176.1 LED266.1 LED268.1 LED270.1 LED272.1 U10.7 | length 121.2
  Top Copper w0.2: LED270.1@27.94,167.07 28.005,167.005 28.068,167.005 28.185,166.888 28.185,166.801 28.531,166.455 29.55,166.455 30.165,167.07 LED272.1@30.74,167.07 30.805,167.005 30.868,167.005 30.985,166.888 30.985,166.801 31.331,166.455 32.344,166.455 32.959,167.07 LED266.1@33.54,167.07 33.605,167.005 33.668,167.005 33.785,166.888 33.785,166.801 34.131,166.455 35.138,166.455 35.753,167.07 LED268.1@36.34,167.07 36.405,167.005 36.468,167.005 36.585,166.888 36.585,166.801 36.931,166.455 37.932,166.455 38.547,167.07 LED174.1@39.14,167.07 39.205,167.005 39.268,167.005 39.385,166.888 39.385,166.801 39.731,166.455 40.726,166.455 41.341,167.07 LED176.1@41.94,167.07 42.005,167.005 42.068,167.005 42.185,166.888 42.185,166.801 42.531,166.455 43.52,166.455 44.135,167.07 LED170.1@44.74,167.07 44.805,167.005 44.868,167.005 44.985,166.888 44.985,166.801 45.331,166.455 46.314,166.455 46.929,167.07 LED172.1@47.54,167.07 47.605,167.005 47.668,167.005 47.785,166.888 47.785,166.801 48.131,166.455 49.108,166.455 49.723,167.07 LED78.1@50.34,167.07 50.405,167.005 50.468,167.005 50.585,166.888 50.585,166.801 50.931,166.455 51.902,166.455 52.517,167.07 LED80.1@53.14,167.07 53.205,167.005 53.268,167.005 53.385,166.888 53.385,166.801 53.731,166.455 54.711,166.455 55.326,167.07 LED74.1@55.94,167.07 56.005,167.005 56.068,167.005 56.185,166.888 56.185,166.801 56.531,166.455 57.49,166.455 57.812,166.777 57.812,166.953 57.929,167.07 LED76.1@58.74,167.07
  Top Copper w0.3: v1@27.893,166.266 LED270.1@27.893,167.08 ; LED76.1@58.74,167.07 58.755,167.055 58.755,166.951 58.801,166.905 v1(58.801,166.355)
  L2_GND w0.3: v3(57.15,97.409) 57.151,97.409 57.532,97.028 62.995,97.028 66.899,100.932 66.899,159.12 59.665,166.355 v1(58.801,166.355)
  Bottom Copper w0.3: U10.7@57.057,99.176 57.057,97.529 57.15,97.436 v3(57.15,97.409)
  other v1: 27.939,166.22
B16: LED82.1 LED84.1 LED86.1 LED88.1 LED178.1 LED180.1 LED182.1 LED184.1 LED274.1 LED276.1 LED278.1 LED280.1 U11.10 | length 104.3
  Top Copper w0.2: LED278.1@27.94,169.87 28.005,169.805 28.068,169.805 28.185,169.688 28.185,169.601 28.537,169.249 29.55,169.249 30.171,169.87 LED280.1@30.74,169.87 30.805,169.805 30.868,169.805 30.985,169.688 30.985,169.601 31.337,169.249 32.344,169.249 32.965,169.87 LED274.1@33.54,169.87 33.605,169.805 33.668,169.805 33.785,169.688 33.785,169.601 34.137,169.249 35.138,169.249 35.759,169.87 LED276.1@36.34,169.87 36.405,169.805 36.468,169.805 36.585,169.688 36.585,169.601 36.937,169.249 37.932,169.249 38.553,169.87 LED182.1@39.14,169.87 39.205,169.805 39.268,169.805 39.385,169.688 39.385,169.601 39.737,169.249 40.726,169.249 41.347,169.87 LED184.1@41.94,169.87 42.005,169.805 42.068,169.805 42.185,169.688 42.185,169.601 42.537,169.249 43.52,169.249 44.141,169.87 LED178.1@44.74,169.87 44.805,169.805 44.868,169.805 44.985,169.688 44.985,169.601 45.337,169.249 46.314,169.249 46.935,169.87 LED180.1@47.54,169.87 47.605,169.805 47.668,169.805 47.785,169.688 47.785,169.601 48.137,169.249 49.108,169.249 49.729,169.87 LED86.1@50.34,169.87 50.405,169.805 50.468,169.805 50.585,169.688 50.585,169.601 50.937,169.249 51.902,169.249 52.523,169.87 LED88.1@53.14,169.87 53.205,169.805 53.268,169.805 53.385,169.688 53.385,169.601 53.737,169.249 54.711,169.249 55.332,169.87 LED82.1@55.94,169.87 56.005,169.805 56.068,169.805 56.185,169.688 56.185,169.601 56.537,169.249 57.49,169.249 58.111,169.87 LED84.1@58.74,169.87
  Top Copper w0.3: v3(26.67,108.438) 26.67,108.411 26.703,108.378 U11.10@26.703,107.237 ; v1(27.996,169.034) LED278.1@27.996,169.806 ; LED84.1@58.74,169.87 58.801,169.809 v1(58.801,169.037)
  Bottom Copper w0.3: v3(26.67,108.438) 23.978,111.13 23.978,166.853 26.159,169.034 v1(27.996,169.034)
B17: LED90.1 LED92.1 LED94.1 LED96.1 LED186.1 LED188.1 LED190.1 LED192.1 LED282.1 LED284.1 LED286.1 LED288.1 U11.13 | length 108
  Top Copper w0.2: LED286.1@27.94,172.67 28.005,172.605 28.068,172.605 28.185,172.488 28.185,172.401 28.543,172.043 29.55,172.043 30.177,172.67 LED288.1@30.74,172.67 30.805,172.605 30.868,172.605 30.985,172.488 30.985,172.401 31.343,172.043 32.344,172.043 32.971,172.67 LED282.1@33.54,172.67 33.605,172.605 33.668,172.605 33.785,172.488 33.785,172.401 34.143,172.043 35.138,172.043 35.765,172.67 LED284.1@36.34,172.67 36.405,172.605 36.468,172.605 36.585,172.488 36.585,172.401 36.943,172.043 37.932,172.043 38.559,172.67 LED190.1@39.14,172.67 39.205,172.605 39.268,172.605 39.385,172.488 39.385,172.401 39.743,172.043 40.726,172.043 41.353,172.67 LED192.1@41.94,172.67 42.005,172.605 42.068,172.605 42.185,172.488 42.185,172.401 42.543,172.043 43.52,172.043 44.147,172.67 LED186.1@44.74,172.67 44.805,172.605 44.868,172.605 44.985,172.488 44.985,172.401 45.343,172.043 46.314,172.043 46.941,172.67 LED188.1@47.54,172.67 47.605,172.605 47.668,172.605 47.785,172.488 47.785,172.401 48.143,172.043 49.108,172.043 49.735,172.67 LED94.1@50.34,172.67 50.405,172.605 50.468,172.605 50.585,172.488 50.585,172.401 50.943,172.043 51.902,172.043 52.529,172.67 LED96.1@53.14,172.67 53.205,172.605 53.268,172.605 53.385,172.488 53.385,172.401 53.743,172.043 54.696,172.043 55.323,172.67 LED90.1@55.94,172.67 56.005,172.605 56.068,172.605 56.185,172.488 56.185,172.401 56.543,172.043 57.49,172.043 57.812,172.365 57.812,172.553 57.929,172.67 LED92.1@58.74,172.67
  Top Copper w0.3: v3(24.384,108.458) 24.384,108.09 24.56,107.914 24.981,107.914 25.203,107.693 U11.13@25.203,107.237 ; LED286.1@27.95,172.655 27.95,171.842 v1(27.996,171.796) ; LED92.1@58.74,172.67 58.755,172.655 58.755,171.811 v1(58.801,171.765)
  Bottom Copper w0.3: v3(24.384,108.458) 23.528,109.314 23.528,170.086 25.238,171.796 v1(27.996,171.796)
B18: LED3.1 LED6.1 LED9.1 LED12.1 LED99.1 LED102.1 LED105.1 LED108.1 LED195.1 LED198.1 LED201.1 LED204.1 U11.16 | length 112.7
  Top Copper w0.2: LED201.1@27.94,175.47 28.005,175.405 28.068,175.405 28.185,175.288 28.185,175.201 28.549,174.837 29.55,174.837 30.183,175.47 LED204.1@30.74,175.47 30.805,175.405 30.868,175.405 30.985,175.288 30.985,175.201 31.349,174.837 32.344,174.837 32.977,175.47 LED195.1@33.54,175.47 33.605,175.405 33.668,175.405 33.785,175.288 33.785,175.201 34.149,174.837 35.138,174.837 35.771,175.47 LED198.1@36.34,175.47 36.405,175.405 36.468,175.405 36.585,175.288 36.585,175.201 36.949,174.837 37.932,174.837 38.565,175.47 LED105.1@39.14,175.47 39.205,175.405 39.268,175.405 39.385,175.288 39.385,175.201 39.749,174.837 40.726,174.837 41.359,175.47 LED108.1@41.94,175.47 42.005,175.405 42.068,175.405 42.185,175.288 42.185,175.201 42.549,174.837 43.52,174.837 44.153,175.47 LED99.1@44.74,175.47 44.805,175.405 44.868,175.405 44.985,175.288 44.985,175.201 45.349,174.837 46.314,174.837 46.947,175.47 LED102.1@47.54,175.47 47.605,175.405 47.668,175.405 47.785,175.288 47.785,175.201 48.149,174.837 49.108,174.837 49.741,175.47 LED9.1@50.34,175.47 50.405,175.405 50.468,175.405 50.585,175.288 50.585,175.201 50.949,174.837 51.902,174.837 52.535,175.47 LED12.1@53.14,175.47 53.205,175.405 53.268,175.405 53.385,175.288 53.385,175.201 53.749,174.837 54.696,174.837 55.329,175.47 LED3.1@55.94,175.47 56.005,175.405 56.068,175.405 56.185,175.288 56.185,175.201 56.549,174.837 57.49,174.837 57.812,175.159 57.812,175.353 57.929,175.47 LED6.1@58.74,175.47
  Top Copper w0.3: v3(23.268,106.328) 23.288,106.309 23.288,106.28 23.541,106.027 U11.16@23.992,106.027 ; LED201.1@27.95,175.455 27.95,174.636 v1(27.996,174.59) ; LED6.1@58.74,175.47 58.755,175.455 58.755,174.616 v1(58.801,174.57)
  Bottom Copper w0.3: v3@23.249,106.347 23.268,106.366 23.268,107.147 23.755,107.633 23.755,108.451 23.078,109.128 23.078,173.192 24.476,174.59 v1(27.996,174.59)
B19: LED15.1 LED18.1 LED21.1 LED24.1 LED111.1 LED114.1 LED117.1 LED120.1 LED207.1 LED210.1 LED213.1 LED216.1 U11.19 | length 116.1
  Top Copper w0.2: LED213.1@27.94,178.27 28.005,178.205 28.068,178.205 28.185,178.088 28.185,178.001 28.555,177.631 29.55,177.631 30.189,178.27 LED216.1@30.74,178.27 30.805,178.205 30.868,178.205 30.985,178.088 30.985,178.001 31.355,177.631 32.344,177.631 32.983,178.27 LED207.1@33.54,178.27 33.605,178.205 33.668,178.205 33.785,178.088 33.785,178.001 34.155,177.631 35.138,177.631 35.777,178.27 LED210.1@36.34,178.27 36.405,178.205 36.468,178.205 36.585,178.088 36.585,178.001 36.955,177.631 37.932,177.631 38.571,178.27 LED117.1@39.14,178.27 39.205,178.205 39.268,178.205 39.385,178.088 39.385,178.001 39.755,177.631 40.726,177.631 41.365,178.27 LED120.1@41.94,178.27 42.005,178.205 42.068,178.205 42.185,178.088 42.185,178.001 42.555,177.631 43.52,177.631 44.159,178.27 LED111.1@44.74,178.27 44.805,178.205 44.868,178.205 44.985,178.088 44.985,178.001 45.355,177.631 46.314,177.631 46.953,178.27 LED114.1@47.54,178.27 47.605,178.205 47.668,178.205 47.785,178.088 47.785,178.001 48.155,177.631 49.108,177.631 49.747,178.27 LED21.1@50.34,178.27 50.405,178.205 50.468,178.205 50.585,178.088 50.585,178.001 50.955,177.631 51.902,177.631 52.541,178.27 LED24.1@53.14,178.27 53.205,178.205 53.268,178.205 53.385,178.088 53.385,178.001 53.755,177.631 54.696,177.631 55.335,178.27 LED15.1@55.94,178.27 56.005,178.205 56.068,178.205 56.185,178.088 56.185,178.001 56.555,177.631 57.49,177.631 57.812,177.953 57.812,178.153 57.929,178.27 LED18.1@58.74,178.27
  Top Copper w0.3: v3(22.805,104.527) U11.19@23.992,104.527 ; v1(27.996,177.384) LED213.1@27.996,178.121 ; LED18.1@58.74,178.27 58.755,178.255 58.755,178.171 58.801,178.125 v1(58.801,177.375)
  Bottom Copper w0.3: v3(22.805,104.527) 22.805,104.554 22.628,104.731 22.628,173.378 26.634,177.384 v1(27.996,177.384)
B20: LED27.1 LED30.1 LED33.1 LED36.1 LED123.1 LED126.1 LED129.1 LED132.1 LED219.1 LED222.1 LED225.1 LED228.1 U11.22 | length 120.5
  Top Copper w0.2: LED225.1@27.94,181.07 28.005,181.005 28.068,181.005 28.185,180.888 28.185,180.801 28.561,180.425 29.55,180.425 30.195,181.07 LED228.1@30.74,181.07 30.805,181.005 30.868,181.005 30.985,180.888 30.985,180.801 31.361,180.425 32.344,180.425 32.989,181.07 LED219.1@33.54,181.07 33.605,181.005 33.668,181.005 33.785,180.888 33.785,180.801 34.161,180.425 35.138,180.425 35.783,181.07 LED222.1@36.34,181.07 36.405,181.005 36.468,181.005 36.585,180.888 36.585,180.801 36.961,180.425 37.932,180.425 38.577,181.07 LED129.1@39.14,181.07 39.205,181.005 39.268,181.005 39.385,180.888 39.385,180.801 39.761,180.425 40.726,180.425 41.371,181.07 LED132.1@41.94,181.07 42.005,181.005 42.068,181.005 42.185,180.888 42.185,180.801 42.561,180.425 43.52,180.425 44.165,181.07 LED123.1@44.74,181.07 44.805,181.005 44.868,181.005 44.985,180.888 44.985,180.801 45.361,180.425 46.314,180.425 46.959,181.07 LED126.1@47.54,181.07 47.605,181.005 47.668,181.005 47.785,180.888 47.785,180.801 48.161,180.425 49.108,180.425 49.753,181.07 LED33.1@50.34,181.07 50.405,181.005 50.468,181.005 50.585,180.888 50.585,180.801 50.961,180.425 51.902,180.425 52.547,181.07 LED36.1@53.14,181.07 53.205,181.005 53.268,181.005 53.385,180.888 53.385,180.801 53.761,180.425 54.696,180.425 55.341,181.07 LED27.1@55.94,181.07 56.005,181.005 56.068,181.005 56.185,180.888 56.185,180.801 56.561,180.425 57.49,180.425 58.135,181.07 LED30.1@58.74,181.07
  Top Copper w0.3: v3(23.241,103.033) 23.248,103.026 U11.22@23.992,103.026 ; LED225.1@27.95,181.055 27.95,180.224 v1(27.996,180.178) ; LED30.1@58.74,181.07 58.755,181.055 58.755,180.226 v1(58.801,180.18)
  Bottom Copper w0.3: v3(23.241,103.033) 23.224,103.016 22.471,103.016 22.178,103.309 22.178,174.807 26.914,179.543 27.361,179.543 v1(27.996,180.178)
B21: LED38.1 LED40.1 LED44.1 LED46.1 LED134.1 LED136.1 LED140.1 LED142.1 LED230.1 LED232.1 LED234.1 LED236.1 U11.25 | length 128.3
  Top Copper w0.2: LED234.1@27.94,183.87 28.005,183.805 28.068,183.805 28.185,183.688 28.185,183.601 28.567,183.219 29.55,183.219 30.201,183.87 LED236.1@30.74,183.87 30.805,183.805 30.868,183.805 30.985,183.688 30.985,183.601 31.367,183.219 32.344,183.219 32.995,183.87 LED230.1@33.54,183.87 33.605,183.805 33.668,183.805 33.785,183.688 33.785,183.601 34.167,183.219 35.138,183.219 35.789,183.87 LED232.1@36.34,183.87 36.405,183.805 36.468,183.805 36.585,183.688 36.585,183.601 36.967,183.219 37.932,183.219 38.583,183.87 LED140.1@39.14,183.87 39.205,183.805 39.268,183.805 39.385,183.688 39.385,183.601 39.767,183.219 40.726,183.219 41.377,183.87 LED142.1@41.94,183.87 42.005,183.805 42.068,183.805 42.185,183.688 42.185,183.601 42.567,183.219 43.52,183.219 44.171,183.87 LED134.1@44.74,183.87 44.805,183.805 44.868,183.805 44.985,183.688 44.985,183.601 45.367,183.219 46.314,183.219 46.965,183.87 LED136.1@47.54,183.87 47.605,183.805 47.668,183.805 47.785,183.688 47.785,183.601 48.167,183.219 49.108,183.219 49.759,183.87 LED44.1@50.34,183.87 50.405,183.805 50.468,183.805 50.585,183.688 50.585,183.601 50.967,183.219 51.902,183.219 52.553,183.87 LED46.1@53.14,183.87 53.205,183.805 53.268,183.805 53.385,183.688 53.385,183.601 53.767,183.219 54.696,183.219 55.347,183.87 LED38.1@55.94,183.87 56.005,183.805 56.068,183.805 56.185,183.688 56.185,183.601 56.567,183.219 57.49,183.219 57.812,183.541 57.812,183.753 57.929,183.87 LED40.1@58.74,183.87
  Top Copper w0.3: v3(22.86,101.533) 22.868,101.526 U11.25@23.992,101.526 ; v1@27.95,183.027 LED234.1@27.95,183.852 ; LED40.1@58.74,183.87 58.755,183.855 58.755,183.031 v1(58.801,182.985)
  Bottom Copper w0.3: v3(22.86,101.533) 21.911,101.533 21.728,101.716 21.728,181.748 22.962,182.982 v1(27.996,182.982)
B22: LED51.1 LED54.1 LED57.1 LED60.1 LED147.1 LED150.1 LED153.1 LED156.1 LED243.1 LED246.1 LED249.1 LED252.1 U11.32 | length 138
  Top Copper w0.2: LED249.1@27.928,186.658 27.981,186.605 28.068,186.605 28.185,186.488 28.185,186.401 28.573,186.013 29.55,186.013 30.195,186.658 30.74,186.658 30.793,186.605 30.868,186.605 30.985,186.488 30.985,186.401 31.373,186.013 32.344,186.013 32.989,186.658 33.54,186.658 33.593,186.605 33.668,186.605 33.785,186.488 33.785,186.401 34.173,186.013 35.138,186.013 35.783,186.658 36.34,186.658 36.393,186.605 36.468,186.605 36.585,186.488 36.585,186.401 36.973,186.013 37.932,186.013 38.577,186.658 39.14,186.658 39.193,186.605 39.268,186.605 39.385,186.488 39.385,186.401 39.773,186.013 40.726,186.013 41.371,186.658 41.94,186.658 41.993,186.605 42.068,186.605 42.185,186.488 42.185,186.401 42.573,186.013 43.52,186.013 44.165,186.658 44.74,186.658 44.793,186.605 44.868,186.605 44.985,186.488 44.985,186.401 45.373,186.013 46.314,186.013 46.959,186.658 47.54,186.658 47.593,186.605 47.668,186.605 47.785,186.488 47.785,186.401 48.173,186.013 49.108,186.013 49.753,186.658 50.34,186.658 50.393,186.605 50.468,186.605 50.585,186.488 50.585,186.401 50.973,186.013 51.902,186.013 52.547,186.658 53.14,186.658 53.193,186.605 53.268,186.605 53.385,186.488 53.385,186.401 53.773,186.013 54.696,186.013 55.341,186.658 55.94,186.658 55.993,186.605 56.068,186.605 56.185,186.488 56.185,186.401 56.331,186.255 57.732,186.255 58.147,186.67 LED54.1@58.74,186.67
  Top Copper w0.3: v3(26.2,98.04) 26.203,98.043 U11.32@26.203,99.316 ; v1(27.996,185.787) LED249.1@27.996,186.537 ; LED54.1@58.74,186.67 58.755,186.655 58.755,186.586 58.801,186.54 v1(58.801,185.79)
  Bottom Copper w0.3: v3(26.2,98.04) 25.78,98.04 25.773,98.033 25.359,98.033 25.353,98.04 23.707,98.04 23.647,97.98 23.233,97.98 23.173,98.04 22.104,98.04 21.278,98.865 21.278,184.219 22.846,185.787 v1(27.996,185.787)